# EAGLE board led_indicator (EAGLE 9.6.2)
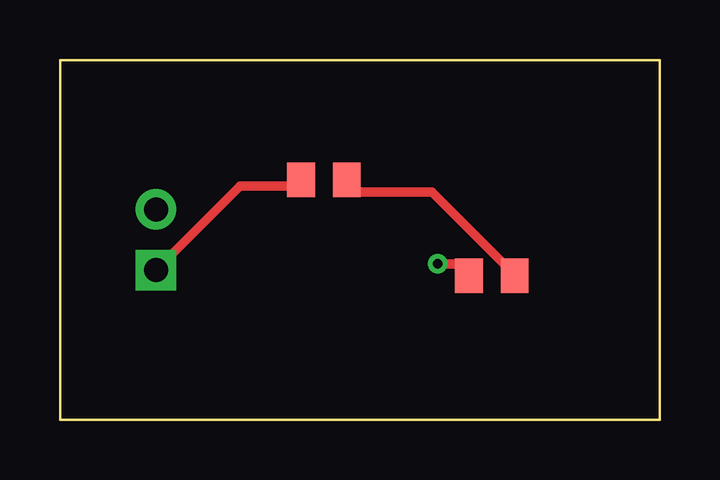
[diagram p0: board, top side]
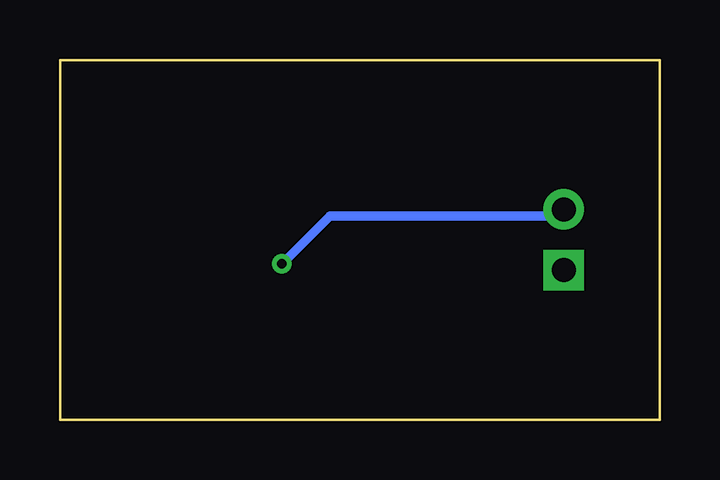
[diagram p1: board, bottom side, seen from below]

Size 25 x 15 mm. Coordinates in mm from the lower left corner, seen from the top.
Outline: 0,0 25,0 25,15 0,15 0,0
Copper layers used: Top, Bottom
Design rules "eh3d-kit": minimum track width 0.15mm, minimum drill 0.3mm, track to track 0.15mm, track to pad 0.15mm, pad to pad 0.15mm, via to via 0.15mm, smd to smd 0.15mm, copper to edge 0.3mm, drill to drill 0.25mm, minimum pad ring 0.15mm, minimum via ring 0.15mm

## Footprints (pad centres in the part's own frame; a part is rotated, then mirrored left to right if it is on the bottom)
LED-0805 = smd 1.15 x 1.45: 1 -0.95,0; 2 0.95,0
HDR-1X02 = drill 1 pad 1.7 square: 1 -1.27,0 | drill 1 pad 1.7: 2 1.27,0
CHIP-0805 = smd 1.15 x 1.45: 1 -0.95,0; 2 0.95,0

## Placement (x,y rotation side)
D1  GREEN  [LED-0805]  18,6 0 top
J1  PWR  [HDR-1X02]  4,7.5 90 top
R1  1k  [CHIP-0805]  11,10 0 top

## Library data of the parts
D1 J1 R1 = eh3d-kit

## Nets
GND: D1.1 J1.2
LEDA: D1.2 R1.2
VCC: J1.1 R1.1

## Tracks (layer width: path | path; a pad name or v marks a point on that pad's centre or on a via)
GND  (via drill 0.4 pad 0.8)
  Top 0.4: v15.75,6.5 16.5,6.5 D1.1
  Bottom 0.4: J1.2 4.5,8.5 13.75,8.5 v15.75,6.5
LEDA
  Top 0.4: D1.2 18.5,6.5 15.5,9.5 12.5,9.5 R1.2
VCC
  Top 0.4: R1.1 9.5,9.75 7.5,9.75 4.5,6.75 J1.1